# Altium PCB ELF 2 & ELF 2_Lite V1.3.PcbDoc (part 5 of 8)
Units mm, origin at the board's own origin, x right, y up, seen from the top; angles counter-clockwise.
Board outline 120 x 75 mm, 4 copper layers (01 TOP, 02 GND, 03 Signal, 04 BOT), stack 0.603 mm thick; 470 components, 412 nets, 2075 pads, 1565 vias.
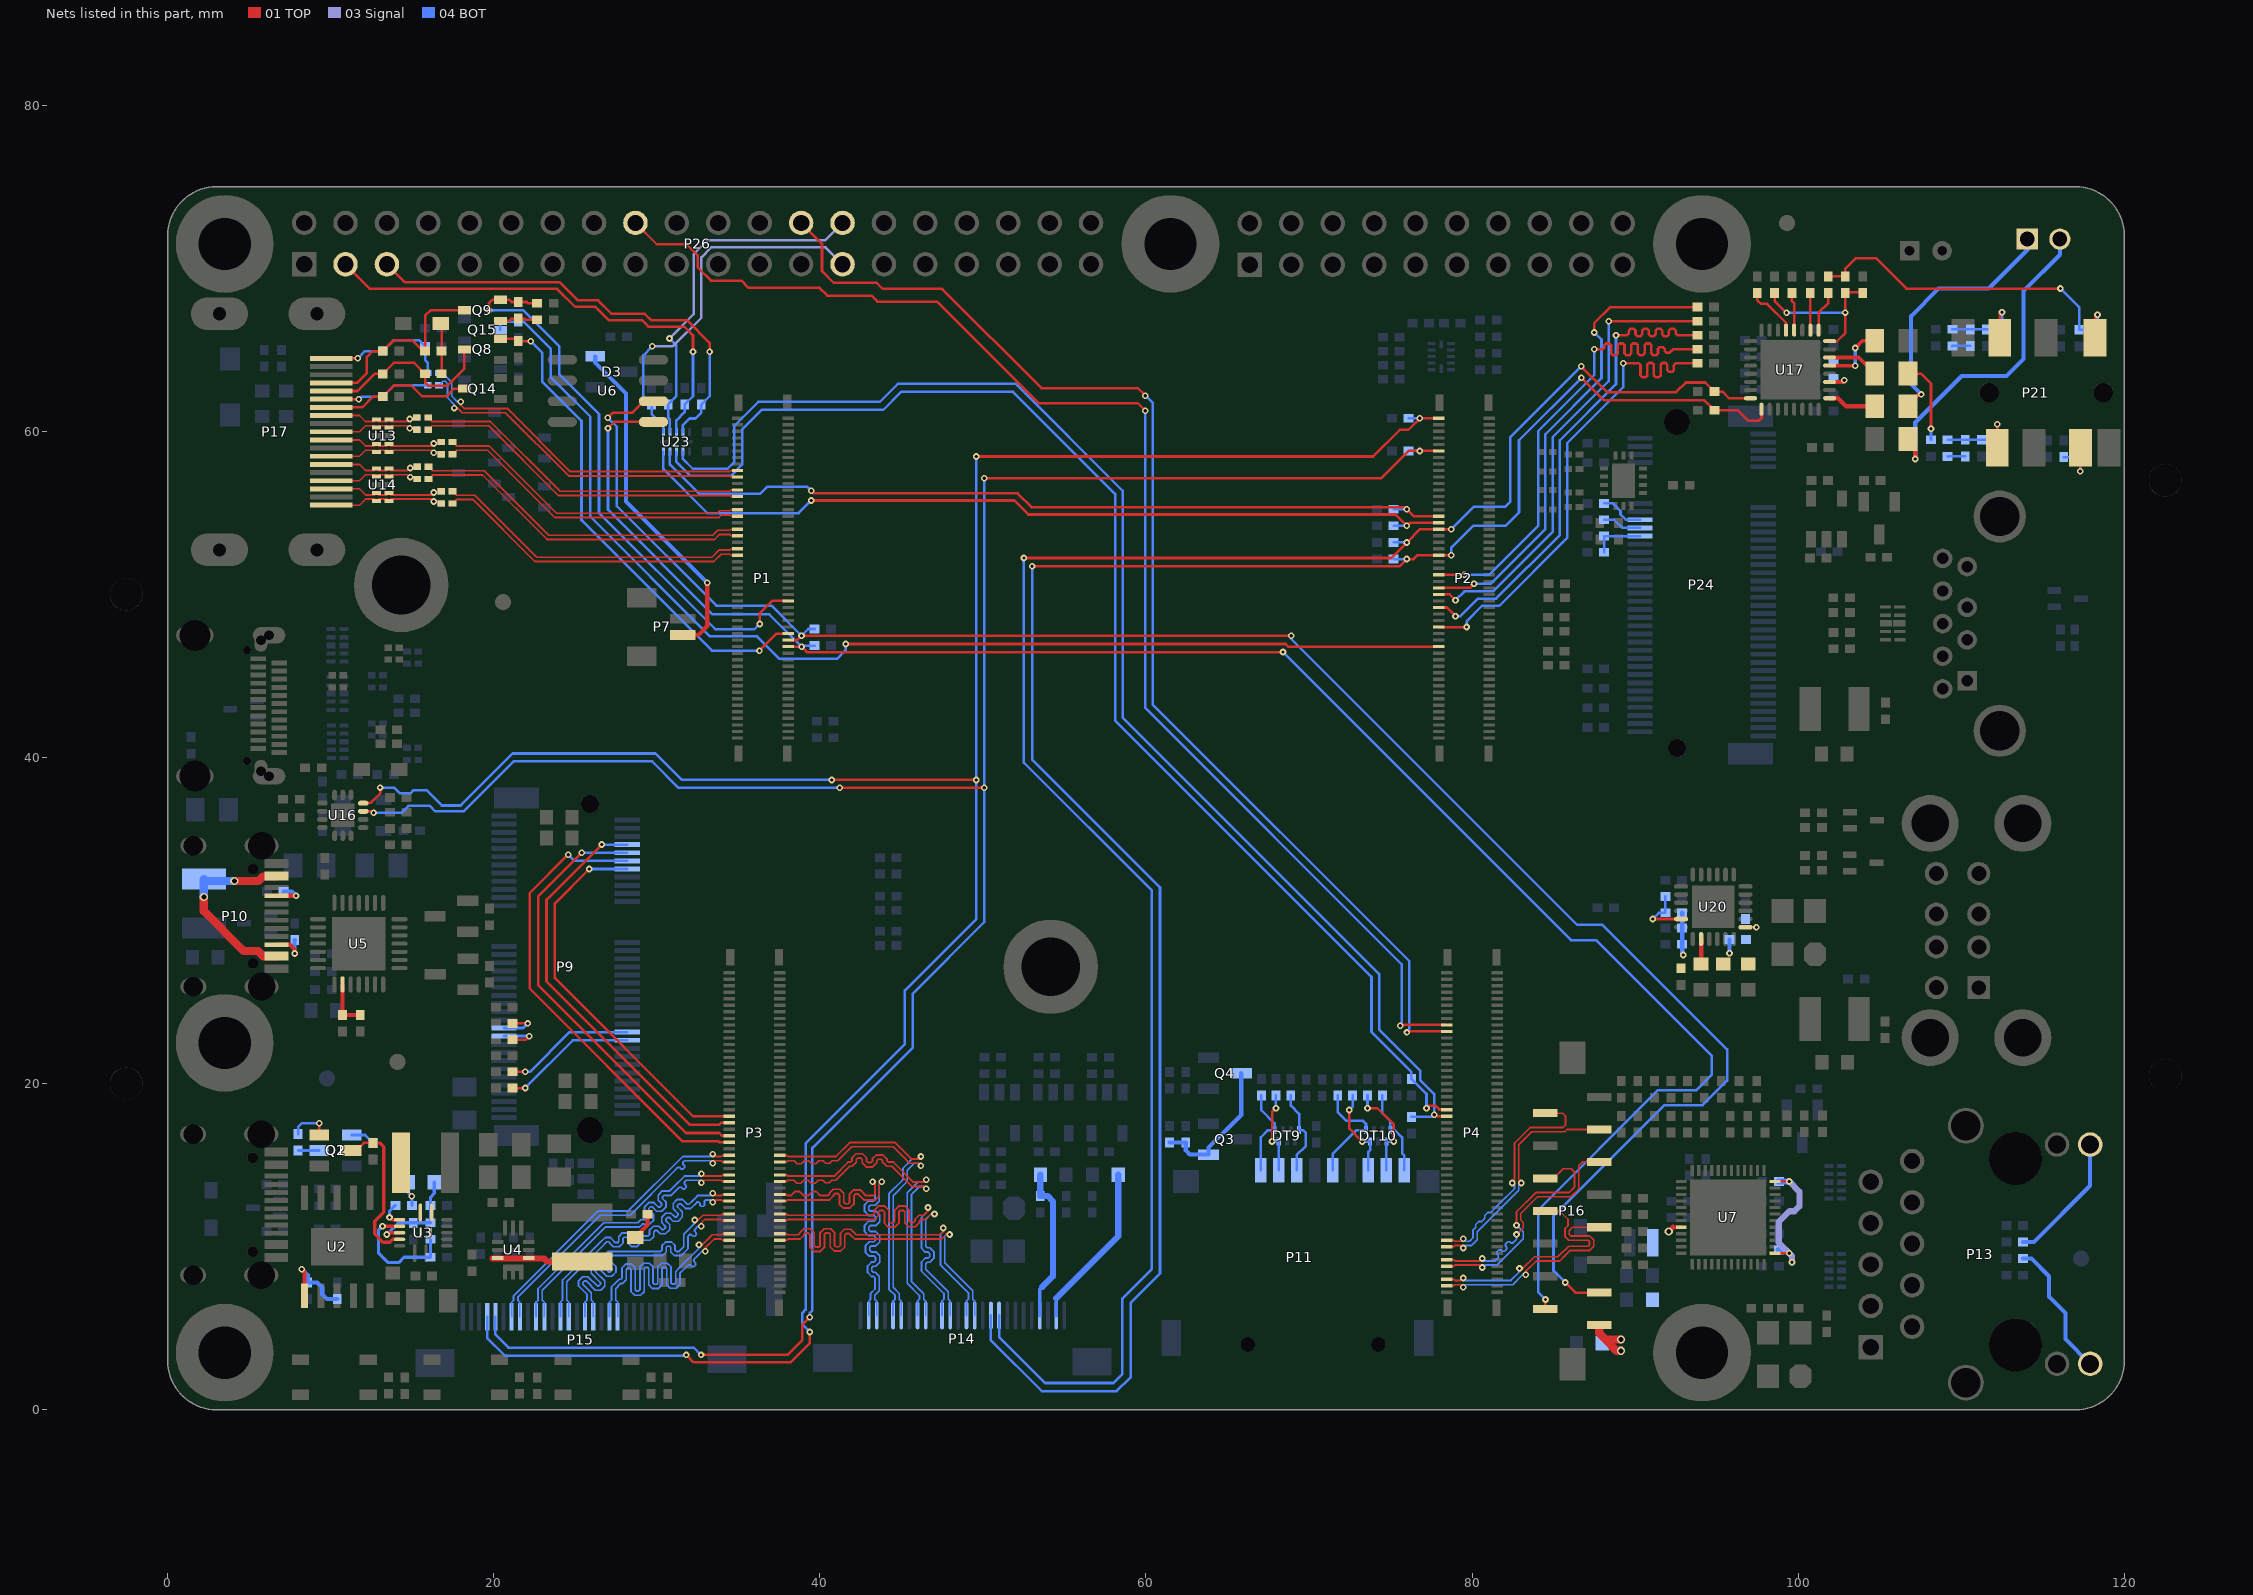
[diagram p6: the nets of this part, all layers, seen from the top]

## Via types
v1: diameter 0.406, hole 0.203, 01 TOP to 04 BOT, tented both sides, 1349 vias
v2: diameter 0.508, hole 0.305, 01 TOP to 04 BOT, tented both sides, 173 vias
v3: diameter 0.6, hole 0.3, 01 TOP to 04 BOT, tented both sides, 34 vias
v4: diameter 0.6, hole 0.3, 01 TOP to 04 BOT, 9 vias

## Nets (pads, with @x,y where several pads share a name; then routed paths per layer and width w, separated by ;. In a path a pad name is that pad's centre, name@x,y a point inside that pad or via, vN(x,y) a via of type N, cw(c..) or ccw(c..) an arc to the next point about the centre after c; other vN are vias at no path point) (continued)
GPIO4_C1--GPIO1_A5--HPDIN: P2.71 Q15.3 R96.2 | length 71.8
  01 TOP w0.156: v1(41.585,46.959) 68.564,46.959 68.724,46.8 P2.71@77.95,46.8
  04 BOT w0.156: Q15.3@20.401,66.226 20.401,66.557 20.578,66.734 R96.2@21.501,66.734 21.812,66.734 23.503,65.043 23.503,63.317 25.917,60.904 25.917,54.775 33.265,47.428 36.147,47.428 37.531,46.044 41.047,46.044 41.585,46.582 v1(41.585,46.959)
GPIO4_C2--GPIO4_B7--HDMI_SCL: P1.68 Q8.2 R81.2 | length 30.6
  01 TOP w0.156: Q8.2@20.401,65.676 21.359,65.676 R81.2@21.501,65.534 v1(22.267,65.534) ; v1(36.293,46.549) 37.344,47.6 P1.68@38.05,47.6
  04 BOT w0.156: v1(22.267,65.534) 22.972,64.828 22.972,63.053 25.381,60.645 25.381,54.553 33.385,46.549 v1(36.293,46.549)
GPIO4_C3--GPIO4_C0--HDMI_SDA: C71.1 P1.58 Q9.2 R83.2 | length 35.7
  01 TOP w0.156: v1(19.708,67.431) 19.708,67.867 19.916,68.076 Q9.2@20.401,68.076 20.95,68.076 21.092,67.934 C71.1@21.501,67.934 22.021,67.934 22.098,67.857 R83.2@22.665,67.857 ; v1(36.307,48.186) 36.307,48.834 37.073,49.6 P1.58@38.05,49.6
  04 BOT w0.156: v1(19.708,67.431) 21.787,67.431 24.021,65.197 24.021,63.499 26.454,61.066 26.454,54.997 33.586,47.864 35.985,47.864 v1(36.307,48.186)
GPIO4_C6--GPIO3_D3: P4.17 P26.18 | length 83.6
  01 TOP w0.156: P26.18@28.69,72.783 29.997,71.476 31.826,71.476 32.5,70.802 32.5,70.065 33.325,69.24 35.181,69.24 35.621,68.8 39.99,68.8 40.464,68.326 43.158,68.326 43.53,67.955 47.172,67.955 53.396,61.73 59.494,61.73 v1(59.958,61.266) ; v1(75.583,23.558) 75.625,23.6 P4.17@78.45,23.6
  04 BOT w0.156: v1(59.958,61.266) 59.958,43.038 75.684,27.312 75.684,23.659 v1(75.583,23.558)
GPIO4_C7--GPIO3_D2: P4.19 P26.26 | length 74.8
  01 TOP w0.156: P26.26@38.85,72.783 40.132,71.501 40.132,69.829 40.847,69.114 43.485,69.114 43.856,68.742 47.498,68.742 53.582,62.658 59.494,62.658 v1(59.958,62.194) ; v1(76.001,23.141) 76.06,23.2 P4.19@78.45,23.2
  04 BOT w0.156: v1(59.958,62.194) 60.422,61.73 60.422,43.23 76.148,27.504 76.148,23.287 v1(76.001,23.141)
HDMI_eARC+: C72.2 DT11.1 P17.14 | length 6.3
  01 TOP w0.156: P17.14@10.038,61.975 v1(11.729,61.975)
  04 BOT w0.156: v1(11.729,61.975) 11.879,62.126 DT11.1@13.193,62.126 13.893,62.826 C72.2@15.958,62.826
HDMI_eARC-: C73.2 DT12.1 P17.19 R98.2 | length 8.1
  01 TOP w0.156: P17.19@10.038,64.475 v1(11.667,64.475)
  04 BOT w0.156: v1(11.667,64.475) 12.118,64.926 DT12.1@13.193,64.926 13.847,65.579 15.44,65.579 R98.2@15.793,65.226 15.793,64.367 15.96,64.2 C73.2@15.96,63.572
HDMI_TX0_N: C65.2 P17.9 R92.1 U13.2 U13.9 | length 7.7
  01 TOP w0.109: P17.9@10.038,59.475 11.769,59.475 12.137,59.107 12.697,59.107 U13.9@12.816,59.226 12.935,59.107 13.467,59.107 U13.2@13.586,59.226 13.705,59.107 16.18,59.107 v1(16.328,59.255) 16.692,59.255 C65.2@16.783,59.346
  04 BOT w0.109: v1(16.328,59.255) 16.692,59.255 R92.1@16.783,59.346
HDMI_TX0_P: C66.2 P17.7 R93.1 U13.1 U13.10 | length 7.7
  01 TOP w0.109: P17.7@10.038,58.475 11.767,58.475 12.137,58.845 12.697,58.845 U13.10@12.816,58.726 12.935,58.845 13.467,58.845 U13.1@13.586,58.726 13.705,58.845 16.18,58.845 v1(16.328,58.696) 16.683,58.696 C66.2@16.783,58.596
  04 BOT w0.109: v1(16.328,58.696) 16.683,58.696 R93.1@16.783,58.596
HDMI_TX1_N: C67.2 P17.6 R90.1 U14.5 U14.6 | length 6.2
  01 TOP w0.109: P17.6@10.038,57.975 11.769,57.975 12.137,57.607 12.697,57.607 U14.6@12.816,57.726 12.935,57.607 13.467,57.607 U14.5@13.586,57.726 13.705,57.607 14.732,57.607 v1(14.881,57.755) 15.236,57.755 C67.2@15.313,57.833
  04 BOT w0.109: v1(14.881,57.755) 15.236,57.755 R90.1@15.313,57.833
HDMI_TX1_P: C68.2 P17.4 R91.1 U14.4 U14.7 | length 6.2
  01 TOP w0.109: P17.4@10.038,56.975 11.767,56.975 12.137,57.345 12.697,57.345 U14.7@12.816,57.226 12.935,57.345 13.467,57.345 U14.4@13.586,57.226 13.705,57.345 14.732,57.345 v1(14.881,57.196) 15.199,57.196 C68.2@15.313,57.083
  04 BOT w0.109: v1(14.881,57.196) 15.199,57.196 R91.1@15.313,57.083
HDMI_TX2_N: C69.2 P17.3 R88.1 U14.2 U14.9 | length 7.7
  01 TOP w0.109: P17.3@10.039,56.475 11.77,56.475 12.138,56.107 12.697,56.107 U14.9@12.816,56.226 12.935,56.107 13.467,56.107 U14.2@13.586,56.226 13.705,56.107 16.18,56.107 v1(16.328,56.255) 16.706,56.255 C69.2@16.783,56.333
  04 BOT w0.109: v1(16.328,56.255) 16.706,56.255 R88.1@16.783,56.333
HDMI_TX2_P: C70.2 P17.1 R89.1 U14.1 U14.10 | length 7.7
  01 TOP w0.109: P17.1@10.038,55.475 11.768,55.475 12.138,55.845 12.506,55.845 12.697,55.845 U14.10@12.816,55.726 12.935,55.845 13.467,55.845 U14.1@13.586,55.726 13.705,55.845 16.18,55.845 v1(16.328,55.696) 16.67,55.696 C70.2@16.783,55.583
  04 BOT w0.109: v1(16.328,55.696) 16.67,55.696 R89.1@16.783,55.583
HDMI_TX3_N: C63.2 P17.12 R86.1 U13.5 U13.6 | length 6.2
  01 TOP w0.109: P17.12@10.039,60.975 11.77,60.975 12.138,60.607 12.697,60.607 U13.6@12.816,60.726 12.935,60.607 13.467,60.607 U13.5@13.586,60.726 13.705,60.607 14.707,60.607 v1(14.855,60.755) 15.197,60.755 C63.2@15.288,60.846
  04 BOT w0.109: v1(14.855,60.755) 15.197,60.755 R86.1@15.288,60.846
HDMI_TX3_P: C64.2 P17.10 R87.1 U13.4 U13.7 | length 6.2
  01 TOP w0.109: P17.10@10.038,59.975 11.768,59.975 12.138,60.345 12.697,60.345 U13.7@12.816,60.226 12.935,60.345 13.467,60.345 U13.4@13.586,60.226 13.705,60.345 14.707,60.345 v1(14.855,60.196) 15.188,60.196 C64.2@15.288,60.096
  04 BOT w0.109: v1(14.855,60.196) 15.188,60.196 R87.1@15.288,60.096
HDMI_TX_CEC_PORT: DT16.1 P17.13 Q14.3 | length 9.2
  01 TOP w0.156: P17.13@10.038,61.475 11.937,61.475 12.588,62.126 DT16.1@13.193,62.126 13.893,62.826 14.942,62.826 15.617,62.15 17.099,62.15 17.575,62.626 Q14.3@18.201,62.626
HDMI_TX_D0_N: C65.1 P1.29 | length 19.4
  01 TOP w0.109: C65.1@17.469,59.346 17.713,59.102 19.724,59.102 23.847,54.979 33.701,54.979 33.853,55.131 34.489,55.131 34.558,55.2 P1.29@34.95,55.2
HDMI_TX_D0_P: C66.1 P1.31 | length 19.4
  01 TOP w0.109: C66.1@17.469,58.596 17.713,58.84 19.616,58.84 23.739,54.717 33.809,54.717 33.961,54.869 34.489,54.869 34.558,54.8 P1.31@34.95,54.8
HDMI_TX_D1_N: C67.1 P1.35 | length 20.8
  01 TOP w0.109: C67.1@15.999,57.833 16.243,57.588 19.419,57.588 23.379,53.628 33.431,53.628 33.733,53.931 34.489,53.931 34.558,54 P1.35@34.95,54
HDMI_TX_D1_P: C68.1 P1.37 | length 20.8
  01 TOP w0.109: C68.1@15.999,57.083 16.243,57.327 19.311,57.327 23.271,53.367 33.539,53.367 33.842,53.669 34.489,53.669 34.558,53.6 P1.37@34.95,53.6
HDMI_TX_D2_N: C69.1 P1.41 | length 19.4
  01 TOP w0.109: C69.1@17.469,56.333 17.713,56.088 18.828,56.088 22.635,52.282 33.383,52.282 33.832,52.731 34.489,52.731 34.558,52.8 P1.41@34.95,52.8
HDMI_TX_D2_P: C70.1 P1.43 | length 19.4
  01 TOP w0.109: C70.1@17.469,55.583 17.713,55.827 18.72,55.827 22.526,52.02 33.492,52.02 33.941,52.469 34.489,52.469 34.558,52.4 P1.43@34.95,52.4
HDMI_TX_D3_N: C63.1 P1.23 | length 20.9
  01 TOP w0.109: C63.1@15.974,60.846 16.218,60.602 19.803,60.602 24.074,56.331 34.489,56.331 34.558,56.4 P1.23@34.95,56.4
HDMI_TX_D3_P: C64.1 P1.25 | length 20.9
  01 TOP w0.109: C64.1@15.974,60.096 16.218,60.34 19.694,60.34 23.965,56.069 34.489,56.069 34.558,56 P1.25@34.95,56
HDMI_TX_SBD_N: C73.1 P1.17 | length 21.5
  01 TOP w0.109: v1(17.983,61.823) 17.983,61.613 18.187,61.409 20.825,61.409 24.703,57.531 34.489,57.531 34.558,57.6 P1.17@34.95,57.6
  04 BOT w0.109: C73.1@16.646,63.572 16.888,63.33 17.122,63.33 17.428,63.024 17.428,62.168 17.773,61.823 v1(17.983,61.823)
HDMI_TX_SBD_P: C72.1 P1.19 | length 21.5
  01 TOP w0.109: v1(17.588,61.428) 17.798,61.428 18.078,61.148 20.716,61.148 24.595,57.269 34.489,57.269 34.558,57.2 P1.19@34.95,57.2
  04 BOT w0.109: C72.1@16.644,62.826 16.887,63.068 17.014,63.068 17.167,62.916 17.167,62.06 17.588,61.638 v1(17.588,61.428)
HDMI_TX_SCL_PORT: DT13.1 P17.15 Q8.3 R82.2 | length 11.4
  01 TOP w0.156: P17.15@10.038,62.475 11.643,62.475 12.694,63.526 DT13.1@13.193,63.526 13.875,64.207 15.112,64.207 R82.2@15.793,63.526 15.793,62.991 15.974,62.81 17.167,62.81 18.201,63.845 Q8.3@18.201,65.026
HDMI_TX_SDA_PORT: DT15.1 P17.16 Q9.3 R85.2 | length 12.4
  01 TOP w0.156: P17.16@10.038,62.975 11.609,62.975 12.222,63.587 12.222,64.571 12.576,64.926 DT15.1@13.193,64.926 13.847,65.579 15.021,65.579 15.675,64.926 R85.2@15.793,64.926 15.793,67.095 16.124,67.426 Q9.3@18.201,67.426
HP_L: DT22.2 P21.5 R128.2 R131.2 R132.1 | length 5.4
  01 TOP w0.156: P21.5@112.202,59.006 v1(112.202,60.433)
  04 BOT w0.156: R128.2@109.156,59.488 R131.2@110.232,59.487 R132.1@111.232,59.487 112.207,59.487 DT22.2@112.232,59.512 112.202,59.542 v1(112.202,60.433)
HP_R: DT23.2 P21.3 R129.2 R133.2 R134.1 | length 5.7
  01 TOP w0.156: P21.3@112.352,65.756 112.352,67.165 v1(112.496,67.309)
  04 BOT w0.156: R129.2@109.448,66.258 R133.2@110.54,66.258 R134.1@111.53,66.258 DT23.2@112.496,66.258 v1(112.496,67.309)
HUB_3V3: C121.2 C123.2 C124.2 FB6.2 R137.1 R140.1 R141.1 R142.1 U20.20 | length 5
  01 TOP w0.279: C123.2@94.038,27.331 U20.20@94.038,28.869
  04 BOT w0.254: R141.1@92.864,30.476 92.884,30.456 R142.1@92.884,29.544 R140.1@92.884,28.544 92.884,27.948 v1(92.942,27.89) ; R137.1@95.78,28.844 95.78,27.999 v1(95.786,27.992)
I2C2--I2C2--SCL: P2.11 P15.26 R1.2 U16.6 | length 147.9
  01 TOP w0.156: U16.6@11.994,36.7 12.539,36.7 v1(12.63,36.608) ; v1(32.715,3.363) 38.013,3.363 38.928,4.277 38.928,5.218 v1(39.385,5.675) ; v1(41.224,38.143) v1(50.082,38.143) ; v1(50.082,57.132) 74.438,57.132 76.106,58.8 v1(76.791,58.8) P2.11@77.95,58.8
  04 BOT w0.156: v1(12.63,36.608) 14.338,36.608 14.762,37.032 16.083,37.032 16.413,36.702 18.151,36.702 21.214,39.765 29.72,39.765 31.343,38.143 v1(41.224,38.143) ; P15.26@20.1,5.7 20.1,4.617 20.905,3.812 32.265,3.812 v1(32.715,3.363) ; v1(39.385,5.675) 39.385,5.942 39.537,6.094 39.537,16.063 45.698,22.225 45.698,25.515 50.082,29.899 v1(50.082,38.143) v1(50.082,57.132) ; R1.2@76.103,58.8 v1(76.791,58.8)
I2C2--I2C2--SDA: P2.1 P15.27 R2.2 U16.7 | length 152
  01 TOP w0.156: U16.7@11.994,37.2 12.021,37.227 12.48,37.227 13.029,37.777 v1(13.029,38.156) ; v1(31.811,3.363) 32.263,2.911 38.2,2.911 39.385,4.095 v1(39.385,4.771) ; v1(40.736,38.623) v1(49.594,38.623) ; v1(49.594,58.46) 73.929,58.46 75.568,60.098 76.09,60.098 v1(76.791,60.8) P2.1@77.95,60.8
  04 BOT w0.156: v1(13.029,38.156) 13.893,38.156 14.253,37.796 14.891,37.796 15.092,37.998 15.882,37.998 16.822,37.058 17.971,37.058 21.16,40.246 29.919,40.246 31.542,38.623 v1(40.736,38.623) ; P15.27@19.6,5.7 19.6,4.41 20.698,3.312 31.76,3.312 v1(31.811,3.363) ; v1(39.385,4.771) 38.928,5.228 38.928,5.947 39.129,6.148 39.129,16.341 45.213,22.425 45.213,25.716 49.594,30.097 v1(49.594,38.623) v1(49.594,58.46) ; R2.2@76.103,60.8 v1(76.791,60.8)
I2C3--I2C3--SCL: C103.2 P2.35 P14.18 R3.2 U17.16 | length 118.2
  01 TOP w0.156: v1(52.513,52.234) 75.043,52.234 v1(75.997,53.187) 76.809,54 P2.35@77.95,54 v1(78.725,54) ; v1(86.684,63.988) 88.27,62.403 92.515,62.403 93.109,62.997 94.296,62.997 C103.2@94.851,62.442 95.343,62.442 95.752,62.032 U17.16@97.072,62.032
  04 BOT w0.156: P14.18@50.991,5.78 50.991,4.463 53.814,1.64 57.993,1.64 58.552,2.199 58.552,6.812 60.359,8.619 60.359,31.832 52.513,39.678 v1(52.513,52.234) ; R3.2@75.189,53.187 v1(75.997,53.187) ; v1(78.725,54) 80.097,55.372 82.017,55.372 82.344,55.699 82.344,59.648 v1(86.684,63.988)
I2C3--I2C3--SDA: C102.2 P2.43 P14.17 R4.2 U17.17 | length 120.3
  01 TOP w0.156: v1(53.013,51.719) 75.544,51.719 v1(75.997,52.171) 76.403,52.171 76.632,52.4 P2.43@77.95,52.4 v1(78.725,52.4) ; v1(86.703,63.284) 88.065,61.922 94.228,61.922 C102.2@94.851,61.299 96.283,61.299 96.926,60.655 97.587,60.655 97.747,60.815 U17.17@97.747,61.357
  04 BOT w0.156: P14.17@50.491,5.78 50.491,4.256 53.607,1.14 58.2,1.14 59.052,1.991 59.052,6.555 60.859,8.362 60.859,32.039 53.013,39.885 v1(53.013,51.719) ; R4.2@75.189,52.171 v1(75.997,52.171) ; v1(78.725,52.4) 78.725,52.867 80.061,54.204 82.042,54.204 82.875,55.036 82.875,59.457 v1(86.703,63.284)
I2C4--I2C4--SCL: P4.45 R10.2 U23.2 | length 82.3
  01 TOP w0.156: v1(77.674,18.085) 77.759,18 P4.45@78.45,18
  04 BOT w0.156: U23.2@31.603,58.76 31.603,58.31 32.206,57.708 34.334,57.708 34.761,58.135 34.761,60.346 36.23,61.815 43.682,61.815 44.775,62.908 52.017,62.908 58.566,56.359 58.566,42.461 74.292,26.735 74.292,23.313 76.81,20.794 76.81,20.227 77.674,19.363 v1(77.674,18.085) 77.547,17.958 R10.2@76.276,17.958
I2C4--I2C4--SCL_3V3: P26.5 R13.1 U23.10 | length 28.1
  01 TOP w0.156: P26.5@13.45,70.243 14.553,69.14 24.053,69.14 25.166,68.027 26.398,68.027 27.213,67.213 29.256,67.213 29.648,66.82 31.847,66.82 33.236,65.432 v1(33.236,64.884)
  04 BOT w0.156: U23.10@31.603,59.96 31.603,60.382 32.01,60.789 32.365,60.789 32.727,61.152 R13.1@32.727,61.646 33.236,62.154 v1(33.236,64.884)
I2C4--I2C4--SDA: P4.43 R9.2 U23.3 | length 80.8
  01 TOP w0.156: v1(77.202,18.497) 77.337,18.631 77.771,18.631 77.99,18.412 P4.43@78.446,18.412
  04 BOT w0.156: U23.3@31.203,58.76 31.203,58.134 32.066,57.272 34.538,57.272 35.252,57.986 35.252,60.142 36.434,61.324 43.885,61.324 44.978,62.417 51.853,62.417 58.102,56.167 58.102,42.269 73.828,26.543 73.828,23.174 76.276,20.725 R9.2@76.276,20.295 77.202,19.369 v1(77.202,18.497)
I2C4--I2C4--SDA_3V3: P26.3 R14.1 U23.9 | length 29.5
  01 TOP w0.156: P26.3@10.91,70.243 12.409,68.744 23.888,68.744 24.998,67.634 26.235,67.634 27.05,66.819 29.093,66.819 29.485,66.427 31.684,66.427 32.22,65.891 v1(32.22,64.884)
  04 BOT w0.156: U23.9@31.203,59.96 31.203,60.667 31.711,61.175 R14.1@31.711,61.646 32.22,62.154 v1(32.22,64.884)
I2C5--I2C7--SCL: P2.31 R11.2 U23.4 | length 50.4
  01 TOP w0.156: v1(39.472,56.363) 39.638,56.196 52.128,56.196 52.975,55.348 75.868,55.348 v1(75.997,55.22) 76.416,54.8 P2.31@77.95,54.8
  04 BOT w0.156: U23.4@30.803,58.76 30.803,57.97 32.588,56.185 36.347,56.185 36.779,56.617 39.218,56.617 v1(39.472,56.363) ; R11.2@75.189,55.22 v1(75.997,55.22)
I2C5--I2C7--SCL_3V3: P26.28 R180.1 U23.8 | length 21.9
  03 Signal w0.156: v1(30.776,65.696) 32.265,67.185 32.265,70.869 33.123,71.727 40.334,71.727 P26.28@41.39,72.783
  04 BOT w0.156: v1(30.776,65.696) 31.206,65.267 31.206,62.156 R180.1@30.695,61.646 30.695,60.846 30.803,60.738 U23.8@30.803,59.96
I2C5--I2C7--SDA: P2.33 R12.2 U23.5 | length 51.6
  01 TOP w0.156: v1(39.464,55.761) 51.932,55.761 52.791,54.902 75.298,54.902 v1(75.997,54.204) 76.193,54.4 P2.33@77.95,54.4
  04 BOT w0.156: U23.5@30.403,58.76 30.403,57.68 33.092,54.991 38.694,54.991 v1(39.464,55.761) ; R12.2@75.189,54.204 v1(75.997,54.204)
I2C5--I2C7--SDA_3V3: P26.27 R181.1 U23.7 | length 22.8
  03 Signal w0.156: v1(29.718,65.211) 30.971,65.211 32.729,66.968 32.729,70.676 33.331,71.278 40.355,71.278 P26.27@41.39,70.243
  04 BOT w0.156: v1(29.718,65.211) 29.171,64.663 29.171,62.154 R181.1@29.679,61.646 29.679,61.075 30.403,60.351 U23.7@30.403,59.96
I2C7--I2C5--SCL: P1.70 P16.3 R5.2 U6.6 | length 115.5
  01 TOP w0.156: v1(27,60.833) 27.315,61.148 28.523,61.148 29.224,61.849 U6.6@29.794,61.849 ; P1.70@38.05,47.2 38.609,47.2 v1(38.874,47.465) v1(68.906,47.465) ; v1(85.72,7.807) 86.338,7.189 P16.3@87.797,7.189
  04 BOT w0.156: v1(27,60.833) 27.545,60.289 27.545,55.424 33.651,49.317 37.021,49.317 v1(38.874,47.465) ; v1(38.874,47.465) 39.288,47.879 R5.2@39.675,47.879 ; v1(68.906,47.465) 68.906,47.273 86.447,29.732 87.993,29.732 95.633,22.092 95.633,20.178 94.132,18.678 91.788,18.678 84.991,11.881 84.991,8.536 v1(85.72,7.807)
I2C7--I2C5--SDA: P1.72 P16.2 R6.2 U6.5 | length 112.6
  01 TOP w0.156: v1(27.008,60.198) 27.389,60.579 U6.5@29.794,60.579 ; P1.72@38.05,46.8 v1(38.877,46.8) 39.209,46.468 v1(68.4,46.468) ; P16.2@84.497,6.189 v1(84.497,6.762)
  04 BOT w0.156: v1(27.008,60.198) 27.008,55.201 33.429,48.781 36.897,48.781 v1(38.877,46.8) 38.94,46.863 R6.2@39.675,46.863 ; v1(68.4,46.468) 86.063,28.805 87.608,28.805 94.705,21.708 94.705,20.563 93.748,19.606 91.403,19.606 84.063,12.265 84.063,7.196 v1(84.497,6.762)
I2S1--I2S0--LRCK: P2.53 R118.1 | length 29
  01 TOP w0.156: P2.53@77.95,50.4 79.864,50.4 v1(80.112,50.648) ; v1(87.488,66.065) 87.488,66.634 88.477,67.624 R118.1@93.822,67.624
  04 BOT w0.156: v1(80.112,50.648) 81.119,50.648 84.49,54.019 84.49,59.824 87.933,63.267 87.933,65.621 v1(87.488,66.065)
I2S1--I2S0--MCLK: P2.65 R116.1 | length 30.8
  01 TOP w0.156: P2.65@77.95,48 v1(79.66,48) ; v1(89.267,64.169) 89.734,64.169 90.222,64.169 90.325,64.067 90.325,63.426 90.428,63.323 90.633,63.323 90.735,63.426 90.735,64.09 90.838,64.193 91.043,64.193 91.146,64.09 91.146,63.426 91.248,63.323 91.454,63.323 91.556,63.426 91.556,64.09 91.659,64.193 91.864,64.193 91.967,64.09 91.967,63.75 92.069,63.648 92.275,63.648 92.377,63.75 92.377,64.067 92.48,64.169 93.702,64.169 R116.1@93.822,64.169
  04 BOT w0.156: v1(79.66,48) 79.66,48.35 80.618,49.307 81.666,49.307 85.824,53.466 85.824,59.271 89.267,62.714 v1(89.267,64.169)
I2S1--I2S0--SCLK: P2.55 R117.1 | length 28.7
  01 TOP w0.156: P2.55@77.95,50 78.628,50 v1(78.982,49.645) ; v1(88.377,66.76) R117.1@93.822,66.76
  04 BOT w0.156: v1(78.982,49.645) 79.522,50.185 81.285,50.185 84.935,53.835 84.935,59.64 88.377,63.083 v1(88.377,66.76)
I2S1--I2S0--SDI0: P2.59 R120.1 | length 30.8
  01 TOP w0.156: P2.59@77.95,49.2 78.448,49.2 v1(78.982,48.666) ; v1(88.822,65.896) 89.427,65.896 89.505,65.896 89.608,65.999 89.608,66.177 89.71,66.28 89.916,66.28 90.018,66.177 90.018,65.943 90.121,65.841 90.326,65.841 90.429,65.943 90.429,66.177 90.531,66.28 90.737,66.28 90.839,66.177 90.839,65.943 90.942,65.841 91.147,65.841 91.25,65.943 91.25,66.177 91.352,66.28 91.557,66.28 91.66,66.177 91.66,65.943 91.763,65.841 91.968,65.841 92.071,65.943 92.071,66.177 92.173,66.28 92.378,66.28 92.481,66.177 92.481,65.999 92.584,65.896 93.34,65.896 R120.1@93.822,65.896
  04 BOT w0.156: v1(78.982,48.666) 79.284,48.666 80.361,49.743 81.472,49.743 85.38,53.65 85.38,59.456 88.822,62.898 v1(88.822,65.896)
I2S1--I2S0--SDO0: P2.49 R119.1 | length 31
  01 TOP w0.156: P2.49@77.95,51.2 v1(79.51,51.2) ; v1(87.488,65.033) 87.933,65.033 88.011,65.033 88.113,65.135 88.113,65.286 88.216,65.388 88.421,65.388 88.524,65.286 88.524,64.78 88.627,64.677 88.832,64.677 88.934,64.78 88.934,65.286 89.037,65.388 89.242,65.388 89.345,65.286 89.345,64.78 89.447,64.677 89.653,64.677 89.755,64.78 89.755,65.286 89.858,65.388 90.063,65.388 90.166,65.286 90.166,64.78 90.268,64.677 90.474,64.677 90.576,64.78 90.576,65.286 90.679,65.388 90.884,65.388 90.987,65.286 90.987,64.78 91.089,64.677 91.295,64.677 91.397,64.78 91.397,65.065 91.5,65.168 91.705,65.168 91.808,65.065 91.808,64.93 91.91,64.828 92.115,64.828 92.218,64.93 92.321,65.033 93.34,65.033 R119.1@93.822,65.033
  04 BOT w0.156: v1(79.51,51.2) 81.042,51.2 84.045,54.203 84.045,60.008 87.488,63.451 v1(87.488,65.033)
I2S2_LRCK_M0: P3.51 P9.10 | length 27.6
  01 TOP w0.156: v1(25.406,34.161) 22.721,31.476 22.721,26.049 31.796,16.973 33.828,16.973 34.001,16.8 P3.51@34.45,16.8
  04 BOT w0.156: v1(25.406,34.161) P9.10@28.179,34.161
I2S2_SCLK_M0: P3.47 P9.8 | length 26.3
  01 TOP w0.156: v1(26.632,34.661) 23.234,31.263 23.234,26.262 32.009,17.487 33.833,17.487 33.947,17.6 P3.47@34.45,17.6
  04 BOT w0.156: v1(26.632,34.661) P9.8@28.179,34.661
I2S2_SDI_M0: P3.53 P9.12 | length 29.1
  01 TOP w0.156: v1(24.56,34.041) 22.207,31.688 22.207,25.836 31.584,16.46 33.776,16.46 33.836,16.4 P3.53@34.45,16.4
  04 BOT w0.156: v1(24.56,34.041) 24.94,33.661 P9.12@28.179,33.661
I2S2_SDO_M0: P3.45 P9.14 | length 24.1
  01 TOP w0.156: v1(25.858,33.161) 23.747,31.051 23.747,26.474 32.221,18 P3.45@34.45,18
  04 BOT w0.156: v1(25.858,33.161) P9.14@28.179,33.161
LHP: C104.2 R128.1 | length 5.1
  01 TOP w0.156: C104.2@106.726,63.547 107.52,63.547 108.14,62.927 v1(108.14,60.161)
  04 BOT w0.156: R128.1@108.14,59.488 v1(108.14,60.161)
LMIC_P: C106.1 DT25.2 P21.1 R123.1 R124.2 | length 22.3
  01 TOP w0.156: C106.1@101.844,69.501 R123.1@102.889,69.501 102.889,69.983 103.531,70.624 104.763,70.624 106.629,68.758 v1(116.078,68.758) ; P21.1@118.202,65.756 118.202,67.001 v1(118.35,67.15)
  04 BOT w0.156: v1(116.078,68.758) 117.22,67.616 R124.2@117.22,66.233 DT25.2@118.35,66.233 v1(118.35,67.15)
LSPKOUT: C122.1 U17.25 | length 3
  01 TOP w0.254: U17.25@101.922,62.032 102.438,62.032 102.93,61.54 C122.1@104.694,61.54
MICBIAS: C114.2 R122.2 R123.2 U17.32 | length 9.9
  01 TOP w0.156: R122.2@98.546,68.488 98.546,68.005 v1(99.283,67.268) ; U17.32@101.922,65.532 102.392,65.532 102.889,66.03 102.889,68.539 C114.2@103.956,68.539
  04 BOT w0.156: v1(99.283,67.268) v1@102.889,67.268
  other v1: 102.889,67.284
MIPI_DPHY_CSI0_RX_CLK_N: P3.72 P14.3 | length 20.5
  01 TOP w0.109: P3.72@37.55,12.8 37.968,12.8 38.037,12.869 40.352,12.869 40.591,12.869 40.835,13.113 40.835,13.166 40.926,13.257 41.108,13.257 41.199,13.166 41.199,12.615 41.443,12.371 41.841,12.371 42.085,12.615 42.085,13.133 42.176,13.223 42.358,13.223 42.448,13.133 42.448,13.113 42.692,12.869 42.942,12.869 43.409,12.869 43.643,13.103 43.643,13.83 v1(43.791,13.979)
  04 BOT w0.109: P14.3@43.491,5.78 43.491,6.663 43.372,6.782 43.372,7.029 43.643,7.299 43.643,7.552 43.643,8.189 43.399,8.433 43.277,8.433 43.186,8.524 43.186,8.705 43.277,8.796 43.426,8.796 43.67,9.04 43.67,9.438 43.426,9.682 43.145,9.682 43.054,9.773 43.054,9.955 43.145,10.046 43.426,10.046 43.67,10.29 43.67,10.688 43.426,10.932 43.093,10.932 43.002,11.023 43.002,11.205 43.093,11.295 43.426,11.295 43.67,11.539 43.67,11.938 43.426,12.182 43.093,12.182 43.002,12.273 43.002,12.454 43.093,12.545 43.399,12.545 43.643,12.789 43.643,13.654 43.643,13.83 v1(43.791,13.979)
MIPI_DPHY_CSI0_RX_CLK_P: P3.70 P14.2 | length 20.5
  01 TOP w0.109: P3.70@37.55,13.2 37.968,13.2 38.037,13.131 38.171,13.131 38.226,13.131 38.486,13.391 38.74,13.391 39.001,13.131 39.276,13.131 39.528,13.383 39.782,13.383 40.034,13.131 40.352,13.131 40.483,13.131 40.574,13.222 40.574,13.275 40.818,13.519 41.216,13.519 41.46,13.275 41.46,12.724 41.551,12.633 41.733,12.633 41.823,12.724 41.823,13.241 42.068,13.485 42.466,13.485 42.71,13.241 42.71,13.222 42.801,13.131 42.942,13.131 43.301,13.131 43.381,13.211 43.381,13.83 v1(43.233,13.979)
  04 BOT w0.109: P14.2@42.991,5.78 42.991,6.663 43.111,6.782 43.111,7.137 43.381,7.408 43.381,7.552 43.381,8.08 43.29,8.171 43.169,8.171 42.925,8.415 42.925,8.814 43.169,9.058 43.318,9.058 43.409,9.148 43.409,9.33 43.318,9.421 43.037,9.421 42.793,9.665 42.793,10.063 43.037,10.307 43.318,10.307 43.409,10.398 43.409,10.58 43.318,10.671 42.985,10.671 42.741,10.915 42.741,11.313 42.985,11.557 43.318,11.557 43.409,11.648 43.409,11.829 43.318,11.92 42.985,11.92 42.741,12.164 42.741,12.563 42.985,12.807 43.29,12.807 43.381,12.897 43.381,13.654 43.381,13.83 v1(43.233,13.979)
MIPI_DPHY_CSI0_RX_D0_N: P3.60 P14.6 | length 20.5
  01 TOP w0.109: P3.60@37.55,15.2 37.968,15.2 38.037,15.269 38.374,15.269 38.429,15.269 38.607,15.091 38.861,15.091 39.038,15.269 39.314,15.269 39.492,15.091 39.746,15.091 39.924,15.269 40.2,15.269 40.345,15.123 40.599,15.123 40.745,15.269 40.94,15.269 41.019,15.269 41.092,15.269 41.947,16.124 44.505,16.124 45.507,15.122 46.049,15.122 v1(46.197,14.973)
  04 BOT w0.109: P14.6@44.991,5.78 44.991,6.663 44.872,6.782 44.872,7.132 44.496,7.508 44.496,13.135 45.359,13.999 45.359,14.7 45.781,15.122 46.049,15.122 v1(46.197,14.973)
MIPI_DPHY_CSI0_RX_D0_P: P3.58 P14.5 | length 20.5
  01 TOP w0.109: P3.58@37.55,15.6 37.968,15.6 38.037,15.531 40.983,15.531 41.839,16.386 44.613,16.386 45.616,15.383 46.049,15.383 v1(46.197,15.532)
  04 BOT w0.109: P14.5@44.491,5.78 44.491,6.663 44.611,6.782 44.611,7.024 44.234,7.4 44.234,13.244 45.098,14.107 45.098,14.808 45.673,15.383 46.049,15.383 v1(46.197,15.532)
MIPI_DPHY_CSI0_RX_D1_N: P3.66 P14.9 | length 20.5
  01 TOP w0.109: P3.66@37.55,14 37.968,14 38.037,14.069 38.349,14.069 38.403,14.069 38.581,13.891 38.835,13.891 39.013,14.069 39.289,14.069 39.467,13.891 39.721,13.891 39.898,14.069 40.174,14.069 40.32,13.923 40.574,13.923 40.72,14.069 40.94,14.069 40.961,14.069 40.98,14.069 41.751,14.84 41.841,14.93 41.991,14.93 42.235,15.174 42.235,15.345 42.326,15.436 42.507,15.436 42.598,15.345 42.598,15.138 42.842,14.894 43.241,14.894 43.485,15.138 43.485,15.273 43.575,15.364 43.757,15.364 43.848,15.273 43.848,15.174 44.092,14.93 44.362,14.93 44.4,14.93 45.631,13.699 46.379,13.699 v1(46.528,13.551)
  04 BOT w0.109: P14.9@46.491,5.78 46.491,6.663 46.372,6.782 46.372,7.111 45.625,7.858 45.625,13.204 46.121,13.699 46.379,13.699 v1(46.528,13.551)
MIPI_DPHY_CSI0_RX_D1_P: P3.64 P14.8 | length 20.5
  01 TOP w0.109: P3.64@37.55,14.4 37.968,14.4 38.037,14.331 40.872,14.331 41.733,15.192 41.751,15.192 41.883,15.192 41.973,15.282 41.973,15.453 42.217,15.697 42.616,15.697 42.86,15.453 42.86,15.246 42.951,15.156 43.132,15.156 43.223,15.246 43.223,15.382 43.467,15.626 43.865,15.626 44.11,15.382 44.11,15.282 44.2,15.192 44.362,15.192 44.508,15.192 45.739,13.961 46.379,13.961 v1(46.528,14.11)
  04 BOT w0.109: P14.8@45.991,5.78 45.991,6.663 46.111,6.782 46.111,7.003 45.364,7.75 45.364,13.312 46.013,13.961 46.379,13.961 v1(46.528,14.11)
MIPI_DPHY_CSI0_RX_D2_N: P3.78 P14.12 | length 20.5
  01 TOP w0.109: P3.78@37.55,11.6 37.968,11.6 38.037,11.669 43.114,11.669 43.353,11.669 43.598,11.913 43.598,12.135 43.688,12.225 43.87,12.225 43.961,12.135 43.961,11.447 44.205,11.203 44.603,11.203 44.847,11.447 44.847,12.135 44.938,12.225 45.12,12.225 45.21,12.135 45.21,11.472 45.455,11.228 45.853,11.228 46.097,11.472 46.097,11.578 46.188,11.669 46.331,11.669 46.479,11.669 46.816,12.007 v1(47.026,12.007)
  04 BOT w0.109: v1(47.026,12.007) 46.816,12.007 46.492,11.683 46.492,11.404 46.492,10.023 46.583,9.932 46.75,9.932 46.994,9.688 46.994,9.29 46.75,9.046 46.583,9.046 46.492,8.955 46.492,8.731 46.492,8.612 47.872,7.232 47.872,6.782 47.991,6.663 P14.12@47.991,5.78
MIPI_DPHY_CSI0_RX_D2_P: P3.76 P14.11 | length 20.5
  01 TOP w0.109: P3.76@37.55,12 37.968,12 38.037,11.931 43.114,11.931 43.245,11.931 43.336,12.022 43.336,12.243 43.58,12.487 43.978,12.487 44.222,12.243 44.222,11.556 44.313,11.465 44.495,11.465 44.586,11.556 44.586,12.243 44.83,12.487 45.228,12.487 45.472,12.243 45.472,11.58 45.563,11.49 45.744,11.49 45.835,11.58 45.835,11.687 46.079,11.931 46.331,11.931 46.37,11.931 46.631,12.192 v1(46.631,12.402)
  04 BOT w0.109: v1(46.631,12.402) 46.631,12.192 46.23,11.791 46.23,11.404 46.23,9.914 46.474,9.67 46.641,9.67 46.732,9.58 46.732,9.398 46.641,9.307 46.474,9.307 46.23,9.063 46.23,8.731 46.23,8.504 47.611,7.124 47.611,6.782 47.491,6.663 P14.11@47.491,5.78
MIPI_DPHY_CSI0_RX_D3_N: P3.84 P14.15 | length 20.5
  01 TOP w0.109: P3.84@37.55,10.4 37.968,10.4 38.037,10.469 38.542,10.469 38.782,10.469 39.026,10.713 39.026,10.754 39.117,10.845 39.298,10.845 39.389,10.754 39.389,9.956 39.633,9.712 40.032,9.712 40.276,9.956 40.276,10.754 40.366,10.845 40.548,10.845 40.639,10.754 40.639,9.979 40.883,9.735 41.281,9.735 41.525,9.979 41.525,10.713 41.616,10.804 41.798,10.804 41.889,10.713 42.133,10.469 42.54,10.469 47.463,10.469 47.743,10.75 v1(47.953,10.75)
  04 BOT w0.109: v1(47.953,10.75) 47.743,10.75 47.653,10.659 47.653,9.009 49.372,7.289 49.372,6.782 49.491,6.663 P14.15@49.491,5.78
MIPI_DPHY_CSI0_RX_D3_P: P3.82 P14.14 | length 20.5
  01 TOP w0.109: P3.82@37.55,10.8 37.968,10.8 38.037,10.731 38.542,10.731 38.674,10.731 38.764,10.822 38.764,10.863 39.008,11.107 39.407,11.107 39.651,10.863 39.651,10.064 39.742,9.973 39.923,9.973 40.014,10.064 40.014,10.863 40.258,11.107 40.656,11.107 40.9,10.863 40.9,10.087 40.991,9.996 41.173,9.996 41.264,10.087 41.264,10.822 41.508,11.066 41.906,11.066 42.15,10.822 42.241,10.731 42.54,10.731 47.355,10.731 47.558,10.935 v1(47.558,11.145)
  04 BOT w0.109: v1(47.558,11.145) 47.558,10.935 47.391,10.767 47.391,8.9 49.111,7.181 49.111,6.782 48.991,6.663 P14.14@48.991,5.78
MIPI_DPHY_CSI2_RX_CLK_N: P4.95 P16.8 | length 14.5
  01 TOP w0.109: P4.95@78.45,8 78.877,8 78.946,7.931 79.297,7.931 v1(79.446,8.079) ; v1(82.902,8.668) 83.113,8.668 83.826,9.381 85.263,9.381 85.288,9.407 85.914,10.033 87.11,10.033 87.201,10.124 87.201,10.306 87.11,10.396 85.935,10.396 85.691,10.64 85.691,10.88 85.691,11.093 85.881,11.284 85.881,11.666 85.358,12.189 P16.8@84.497,12.189
  04 BOT w0.109: v1(79.446,8.079) 79.595,7.931 82.375,7.931 82.902,8.458 v1(82.902,8.668)
MIPI_DPHY_CSI2_RX_CLK_P: P4.97 P16.7 | length 14.5
  01 TOP w0.109: P4.97@78.45,7.6 78.877,7.6 78.946,7.669 79.297,7.669 v1(79.446,7.521) ; v1(83.298,8.273) 83.298,8.483 83.934,9.12 85.371,9.12 85.658,9.407 86.023,9.771 87.219,9.771 87.463,10.016 87.463,10.414 87.219,10.658 86.044,10.658 85.953,10.749 85.953,10.88 85.953,10.985 86.157,11.189 P16.7@87.797,11.189
  04 BOT w0.109: v1(79.446,7.521) 79.595,7.669 79.979,7.669 82.484,7.669 83.087,8.273 v1(83.298,8.273)
MIPI_DPHY_CSI2_RX_D0_N: P4.83 P16.14 | length 14.5
  01 TOP w0.109: P4.83@78.45,10.4 78.877,10.4 78.946,10.331 79.297,10.331 v1(79.446,10.479) ; v1(82.455,13.906) 82.604,14.055 82.604,16.357 83.556,17.309 85.566,17.309 85.726,17.469 85.726,18.011 85.548,18.189 P16.14@84.497,18.189
  04 BOT w0.109: v1(79.446,10.479) 79.595,10.331 79.843,10.331 80.056,10.543 80.056,11.019 80.164,11.127 80.221,11.184 80.221,11.363 80.4,11.543 80.58,11.543 80.775,11.738 80.775,11.915 80.954,12.095 81.132,12.095 81.726,12.689 82.604,13.567 82.604,13.758 v1(82.455,13.906)
MIPI_DPHY_CSI2_RX_D0_P: P4.85 P16.13 | length 14.5
  01 TOP w0.109: P4.85@78.45,10 78.877,10 78.946,10.069 79.297,10.069 v1(79.446,9.921) ; v1(83.014,13.906) 82.865,14.055 82.865,16.249 83.664,17.047 85.674,17.047 85.816,17.189 P16.13@87.797,17.189
  04 BOT w0.109: v1(79.446,9.921) 79.595,10.069 79.952,10.069 80.317,10.435 80.317,10.91 82.865,13.459 82.865,13.758 v1(83.014,13.906)
MIPI_DPHY_CSI2_RX_D1_N: P4.89 P16.11 | length 14.5
  01 TOP w0.109: P4.89@78.45,9.2 78.877,9.2 78.946,9.131 80.466,9.131 v1(80.614,9.279) ; v1(82.722,10.753) 82.87,10.902 82.893,10.902 83.138,11.147 83.138,11.483 82.984,11.637 82.984,12.034 84.007,13.057 86.049,13.057 86.533,13.54 86.533,14.967 86.754,15.189 P16.11@87.797,15.189
  04 BOT w0.109: v1(80.614,9.279) 80.763,9.131 81.397,9.131 81.563,9.297 81.601,9.335 81.601,9.464 81.518,9.547 81.518,9.676 81.646,9.804 81.775,9.804 81.858,9.721 81.987,9.721 82.115,9.849 82.115,9.977 82.051,10.041 82.051,10.169 82.18,10.298 82.308,10.298 82.372,10.234 82.5,10.234 82.668,10.402 82.722,10.456 v1(82.722,10.753)
MIPI_DPHY_CSI2_RX_D1_P: P4.91 P16.10 | length 14.5
  01 TOP w0.109: P4.91@78.45,8.8 78.877,8.8 78.946,8.869 80.466,8.869 v1(80.614,8.721) ; v1(82.722,11.312) 82.722,12.142 83.898,13.318 85.941,13.318 86.271,13.649 86.271,14.59 86.081,14.78 85.581,14.78 84.99,14.189 P16.10@84.497,14.189
  04 BOT w0.109: v1(80.614,8.721) 80.763,8.869 81.505,8.869 83.132,10.496 83.132,10.924 82.893,11.163 82.87,11.163 v1(82.722,11.312)
MIPI_DPHY_DSI_TX_CLK_N: P3.69 P15.18 | length 18.3
  01 TOP w0.109: v1(33.421,13.279) 33.57,13.131 33.958,13.131 34.027,13.2 P3.69@34.45,13.2
  04 BOT w0.109: P15.18@24.1,5.7 24.1,6.608 24.219,6.727 24.219,7.949 26.512,10.242 26.834,10.564 27.152,10.564 27.377,10.339 27.377,10.324 27.449,10.252 27.593,10.252 27.664,10.324 27.664,10.621 27.889,10.846 28.25,10.846 28.475,10.621 28.475,10.35 28.546,10.278 28.69,10.278 28.762,10.35 28.762,10.43 28.987,10.655 29.332,10.655 29.472,10.655 29.544,10.727 29.544,11.003 29.799,11.258 30.117,11.258 30.323,11.052 30.424,11.052 30.526,11.154 30.526,11.255 30.298,11.483 30.298,11.801 30.553,12.056 30.871,12.056 31.099,11.828 31.2,11.828 31.302,11.929 31.302,12.031 31.005,12.328 31.005,12.646 31.259,12.901 31.578,12.901 31.873,12.606 31.974,12.606 32.162,12.794 32.499,13.131 33.273,13.131 v1(33.421,13.279)
MIPI_DPHY_DSI_TX_CLK_P: P3.71 P15.17 | length 18.2
  01 TOP w0.109: v1(33.421,12.721) 33.57,12.869 33.958,12.869 34.027,12.8 P3.71@34.45,12.8
  04 BOT w0.109: P15.17@24.6,5.7 24.6,6.608 24.481,6.727 24.481,7.841 26.576,9.936 26.942,10.302 27.044,10.302 27.116,10.23 27.116,10.215 27.341,9.99 27.701,9.99 27.926,10.215 27.926,10.512 27.998,10.584 28.141,10.584 28.213,10.512 28.213,10.241 28.438,10.016 28.798,10.016 29.023,10.241 29.023,10.322 29.095,10.394 29.332,10.394 29.581,10.394 29.806,10.619 29.806,10.895 29.907,10.996 30.009,10.996 30.215,10.79 30.533,10.79 30.788,11.045 30.788,11.363 30.56,11.591 30.56,11.693 30.661,11.794 30.763,11.794 30.991,11.566 31.309,11.566 31.563,11.821 31.563,12.139 31.266,12.437 31.266,12.538 31.368,12.64 31.469,12.64 31.764,12.344 32.083,12.344 32.472,12.734 32.573,12.734 32.645,12.662 32.645,12.551 32.717,12.479 32.861,12.479 32.932,12.551 32.932,12.797 33.004,12.869 33.273,12.869 v1(33.421,12.721)
MIPI_DPHY_DSI_TX_D0_N: P3.57 P15.24 | length 18.3
  01 TOP w0.109: v1(33.421,15.679) 33.57,15.531 33.958,15.531 34.027,15.6 P3.57@34.45,15.6
  04 BOT w0.109: P15.24@21.1,5.7 21.1,6.608 21.219,6.727 21.219,6.998 26.414,12.193 28.252,12.193 31.591,15.531 33.273,15.531 v1(33.421,15.679)
MIPI_DPHY_DSI_TX_D0_P: P3.59 P15.23 | length 18.3
  01 TOP w0.109: v1(33.421,15.121) 33.57,15.269 33.958,15.269 34.027,15.2 P3.59@34.45,15.2
  04 BOT w0.109: P15.23@21.6,5.7 21.6,6.608 21.481,6.727 21.481,6.89 26.522,11.931 28.361,11.931 31.052,14.622 31.293,14.864 31.395,14.864 31.502,14.757 31.603,14.757 31.705,14.858 31.705,14.96 31.598,15.067 31.598,15.168 31.699,15.269 33.273,15.269 v1(33.421,15.121)
MIPI_DPHY_DSI_TX_D1_N: P3.63 P15.21 | length 18.3
  01 TOP w0.109: v1(32.735,14.479) 32.884,14.331 33.958,14.331 34.027,14.4 P3.63@34.45,14.4
  04 BOT w0.109: P15.21@22.6,5.7 22.6,6.608 22.719,6.727 22.719,7.438 26.754,11.473 28.007,11.473 28.839,11.473 29.012,11.646 29.33,11.646 29.338,11.638 29.439,11.638 29.541,11.74 29.541,11.841 29.25,12.132 29.25,12.45 29.505,12.705 29.823,12.705 30.092,12.436 30.193,12.436 30.295,12.538 30.295,12.639 30.088,12.846 30.088,13.165 30.342,13.419 30.661,13.419 30.672,13.408 30.774,13.408 31.142,13.776 31.697,14.331 32.587,14.331 v1(32.735,14.479)
MIPI_DPHY_DSI_TX_D1_P: P3.65 P15.20 | length 18.2
  01 TOP w0.109: v1(32.735,13.921) 32.884,14.069 33.958,14.069 34.027,14 P3.65@34.45,14
  04 BOT w0.109: P15.20@23.1,5.7 23.1,6.608 22.981,6.727 22.981,7.33 26.863,11.211 28.035,11.211 28.947,11.211 29.12,11.384 29.222,11.384 29.23,11.377 29.548,11.377 29.803,11.631 29.803,11.95 29.512,12.24 29.512,12.342 29.613,12.443 29.715,12.443 29.984,12.175 30.302,12.175 30.556,12.429 30.556,12.748 30.349,12.955 30.349,13.056 30.451,13.158 30.552,13.158 30.564,13.146 30.882,13.146 31.327,13.591 31.387,13.651 31.489,13.651 31.595,13.544 31.697,13.544 31.798,13.646 31.798,13.747 31.692,13.854 31.692,13.956 31.805,14.069 32.587,14.069 v1(32.735,13.921)
MIPI_DPHY_DSI_TX_D2_N: P3.75 P15.15 | length 18.3
  01 TOP w0.109: v1(32.331,11.64) 32.541,11.64 32.832,11.931 33.958,11.931 34.027,12 P3.75@34.45,12
  04 BOT w0.109: P15.15@25.6,5.7 25.6,6.608 25.719,6.727 25.719,7.071 25.202,7.589 25.202,7.907 25.457,8.161 25.775,8.161 26.343,7.593 26.444,7.593 26.546,7.695 26.546,7.796 25.978,8.364 25.978,8.683 26.232,8.937 26.551,8.937 27.035,8.453 27.136,8.453 27.238,8.555 27.238,8.656 26.754,9.14 26.754,9.459 27.008,9.713 30.11,9.713 30.241,9.713 30.313,9.785 30.313,10.061 30.538,10.286 30.898,10.286 31.123,10.061 31.123,9.785 31.195,9.713 31.364,9.713 31.378,9.713 31.654,9.989 31.654,10.752 32.331,11.43 v1(32.331,11.64)
MIPI_DPHY_DSI_TX_D2_P: P3.77 P15.14 | length 18.2
  01 TOP w0.109: v1(32.726,11.245) 32.726,11.455 32.94,11.669 33.958,11.669 34.027,11.6 P3.77@34.45,11.6
  04 BOT w0.109: P15.14@26.1,5.7 26.1,6.608 25.981,6.727 25.981,7.179 25.463,7.697 25.463,7.798 25.565,7.9 25.666,7.9 26.235,7.332 26.553,7.332 26.807,7.586 26.807,7.905 26.239,8.473 26.239,8.574 26.341,8.676 26.442,8.676 26.926,8.192 27.245,8.192 27.499,8.446 27.499,8.764 27.015,9.249 27.015,9.35 27.117,9.452 30.11,9.452 30.35,9.452 30.575,9.677 30.575,9.953 30.647,10.025 30.79,10.025 30.862,9.953 30.862,9.677 31.087,9.452 31.364,9.452 31.487,9.452 31.915,9.88 31.915,10.644 32.012,10.741 32.113,10.741 32.22,10.634 32.321,10.634 32.423,10.735 32.423,10.837 32.316,10.944 32.316,11.045 32.516,11.245 v1(32.726,11.245)
MIPI_DPHY_DSI_TX_D3_N: P3.81 P15.12 | length 18.3
  01 TOP w0.109: v1(32.585,10.116) 32.795,10.116 33.41,10.731 33.958,10.731 34.027,10.8 P3.81@34.45,10.8
  04 BOT w0.109: P15.12@27.1,5.7 27.1,6.608 27.219,6.727 27.219,7.538 27.41,7.728 27.69,8.009 27.794,8.009 27.866,8.08 27.866,8.71 28.091,8.935 28.451,8.935 28.676,8.71 28.676,7.357 28.748,7.285 28.891,7.285 28.963,7.357 28.963,8.766 29.188,8.991 29.548,8.991 29.773,8.766 29.773,7.763 29.845,7.691 29.989,7.691 30.06,7.763 30.06,8.766 30.285,8.991 30.646,8.991 30.871,8.766 30.871,7.778 30.942,7.707 31.086,7.707 31.158,7.778 31.158,8.479 31.445,8.766 31.474,8.795 32.585,9.906 v1(32.585,10.116)
MIPI_DPHY_DSI_TX_D3_P: P3.83 P15.11 | length 18.2
  01 TOP w0.109: v1(32.98,9.721) 32.98,9.931 33.518,10.469 33.958,10.469 34.027,10.4 P3.83@34.45,10.4
  04 BOT w0.109: P15.11@27.6,5.7 27.6,6.608 27.481,6.727 27.481,6.773 27.481,7.429 27.799,7.747 27.903,7.747 28.128,7.972 28.128,8.602 28.199,8.674 28.343,8.674 28.415,8.602 28.415,7.248 28.64,7.023 29,7.023 29.225,7.248 29.225,8.658 29.297,8.729 29.44,8.729 29.512,8.658 29.512,7.654 29.737,7.429 30.097,7.429 30.322,7.654 30.322,8.658 30.394,8.729 30.537,8.729 30.609,8.658 30.609,7.67 30.834,7.445 31.194,7.445 31.419,7.67 31.419,8.37 31.474,8.425 31.669,8.619 31.928,8.879 32.061,8.879 32.155,8.785 32.287,8.785 32.375,8.873 32.375,9.006 32.282,9.1 32.282,9.232 32.469,9.419 32.77,9.721 v1(32.98,9.721)
NetC7_2: C7.2 R16.2 U2.1 | length 5.1
  01 TOP w0.254: v1(8.224,8.619) 8.4,8.444 U2.1@8.4,7
  04 BOT w0.254: v1(8.224,8.619) 8.598,8.246 R16.2@8.598,7.801 9.174,7.801 9.487,7.488 9.487,7.078 9.784,6.782 C7.2@10.4,6.782
NetC8_1: C8.1 L1.1 R21.1 U3.9 | length 1.5
  04 BOT w0.198: R21.1@14.778,13.953 14.778,13.293 v1(14.981,13.09) C8.1@14.981,12.531
NetC8_2: C8.2 U3.10 | length 1.6
  01 TOP w0.198: v1(13.609,11.794) 13.754,11.65 U3.10@14.225,11.65
  04 BOT w0.198: v1(13.609,11.794) 13.609,12.175 C8.2@13.965,12.531
NetC16_1: C16.1 R21.2 R22.1 R24.1 U3.12 | length 6.4
  01 TOP w0.198: v1(13.447,10.749) 13.548,10.85 U3.12@14.225,10.85
  04 BOT w0.198: v1(13.447,10.749) 14.162,11.464 R24.1@15.057,11.464 R22.1@16.124,11.464 C16.1@16.124,12.531 16.124,13.039 16.352,13.268 R21.2@16.352,13.953
NetC19_2: C19.2 R26.2 U3.11 | length 7.5
  01 TOP w0.198: v1(13.175,11.25) U3.11@14.225,11.25
  04 BOT w0.198: v1(13.175,11.25) 12.924,11 12.924,9.62 13.518,9.026 14.165,9.026 14.495,9.356 C19.2@16.124,9.356 R26.2@16.124,10.448
NetC28_1: C28.1 Q3.1 Q4.3 R33.2 | length 8.8
  04 BOT w0.254: R33.2@61.441,16.392 C28.1@62.441,16.392 62.441,15.892 62.683,15.65 Q3.1@63.841,15.65 63.841,16.078 65.841,18.078 Q4.3@65.841,20.634
NetC31_2: C31.2 R38.2 U5.9 | length 3
  01 TOP w0.229: R38.2@10.72,24.2 R38.2@10.723,24.202 ; U5.9@10.723,26.082 R38.2@10.723,24.202 ; C31.2@11.808,24.203 R38.2@10.723,24.203
NetC38_2: C38.2 C39.2 FB1.2 U7.1 U7.12 | length 9.3
  01 TOP w0.156: U7.1@98.576,9.6 v1(99.446,9.6) ; U7.12@98.576,14 v1(99.446,14)
  03 Signal w0.381: v1(99.446,14) 100.071,13.375 100.071,12.48 99.766,12.175 99.461,12.175 98.805,11.519 98.805,10.241 v1(99.446,9.6) 99.614,9.432 v1(99.614,9.051)
  04 BOT w0.381: C38.2@98.808,9.8 99.246,9.8 v1(99.446,9.6) ; C39.2@98.808,14 v1(99.446,14)
NetC60_2: C60.2 FB3.2 P14.23 | length 9.6
  04 BOT w0.229: P14.23@53.491,5.78 53.491,7.385 53.639,7.533
  04 BOT w0.381: FB3.2@53.522,14.413 53.509,14.401 C60.2@53.509,13.113 53.962,13.113 54.295,12.78 54.295,8.189 53.639,7.533
NetC71_2: C71.2 Q9.1 R84.2 | length 2.4
  01 TOP w0.156: Q9.1@20.401,66.776 20.958,66.776 21.1,66.918 C71.2@21.501,66.918 21.875,66.918 21.954,66.839 R84.2@22.664,66.839
NetC104_1: C104.1 U17.30 | length 3.2
  01 TOP w0.229: U17.30@101.922,64.532 103.708,64.532 C104.1@104.694,63.547
NetC105_2: C105.2 U17.2 | length 2.3
  01 TOP w0.156: C105.2@100.744,68.485 100.747,68.481 U17.2@100.747,66.207
NetC106_2: C106.2 U17.1 | length 2.6
  01 TOP w0.156: U17.1@101.247,66.207 101.247,67.282 101.844,67.879 C106.2@101.844,68.585
NetC107_1: C107.1 U17.29 | length 4
  01 TOP w0.229: U17.29@101.922,64.032 v1(103.503,64.032) ; v1(103.503,65.112) 103.944,65.554 C107.1@104.694,65.554
  04 BOT w0.229: v1(103.503,64.032) v1(103.503,65.112)
NetC108_2: C108.2 U17.5 | length 3.2
  01 TOP w0.156: C108.2@97.479,68.485 97.479,68.056 97.718,67.817 98.092,67.817 99.247,66.663 U17.5@99.247,66.207
NetC109_2: C109.2 U17.4 | length 2.3
  01 TOP w0.156: C109.2@99.613,68.488 99.613,67.996 99.747,67.862 U17.4@99.747,66.207
NetC111_2: C111.2 P19.2 | length 20.2
  01 TOP w0.254: C111.2@106.726,59.534 107.173,59.086 v1(107.173,58.306)
  04 BOT w0.254: v1(107.173,58.306) 107.173,60.547 110.025,63.398 112.776,63.398 113.817,64.439 113.817,68.605 116.043,70.831 P19.2@116.043,71.793
NetC112_2: C112.2 C113.2 U17.27 | length 0.9
  01 TOP w0.254: U17.27@101.922,63.032 102.728,63.032 v1(102.829,63.133)
NetC119_2: C119.2 R131.1 | length 1.1
  04 BOT w0.156: C119.2@109.161,58.46 109.172,58.471 R131.1@110.232,58.471
NetC120_2: C120.2 R133.1 | length 1.1
  04 BOT w0.156: C120.2@109.448,65.23 109.46,65.242 R133.1@110.54,65.242
NetC122_2: C122.2 P19.1 | length 15.7
  01 TOP w0.254: C122.2@106.726,61.54 106.726,61.609 107.382,62.265 v1(107.549,62.265)
  04 BOT w0.254: v1(107.549,62.265) 106.909,62.906 106.909,67.056 108.611,68.758 111.684,68.758 114.043,71.117 P19.1@114.043,71.793
NetC126_2: C126.2 R137.2 U20.1 | length 0.7
  01 TOP w0.156: U20.1@96.763,29.594 v1(97.435,29.594)
NetC128_2: C128.2 R141.2 U20.17 | length 3.7
  01 TOP w0.156: v1(91.068,30.094) U20.17@92.813,30.094
  04 BOT w0.156: v1(91.068,30.094) 91.45,30.476 R141.2@91.848,30.476 C128.2@91.848,31.476
NetC135_2: C135.2 P24.50 R149.2 | length 3.2
  04 BOT w0.156: C135.2@88.1,52.58 R149.2@88.1,53.58 P24.50@90.3,53.58
NetD2_1: D2.1 R28.2 | length 1.8
  01 TOP w0.254: D2.1@28.671,10.562 29.433,11.324 R28.2@29.433,11.998
NetD3_2: D3.2 P7.2 | length 21.1
  01 TOP w0.254: P7.2@31.593,47.506 32.546,47.506 33.091,48.051 v1(33.091,50.725)
  04 BOT w0.254: D3.2@26.229,64.602 26.229,64.206 28.109,62.326 28.109,55.707 v1(33.091,50.725)
NetD5_2: D5.2 R82.1 R85.1 | length 3.1
  01 TOP w0.156: D5.2@16.751,66.626 16.809,66.568 R85.1@16.809,64.926 R82.1@16.809,63.526
NetDT9_1: DT9.1 P11.1 R39.2 | length 5.5
  04 BOT w0.156: P11.1@67.041,14.701 67.041,16.712 67.479,17.15 DT9.1@67.891,17.15 67.891,17.558 67.081,18.368 R39.2@67.081,19.279
NetDT9_4: DT9.4 P11.3 R41.2 | length 5.3
  04 BOT w0.156: R41.2@68.885,19.279 68.885,18.647 69.391,18.141 DT9.4@69.391,17.15 69.624,17.15 69.803,16.971 69.803,16.173 69.241,15.61 P11.3@69.241,14.701
NetDT9_7: DT9.7 P11.2 R40.2 | length 5.1
  01 TOP w0.156: v1(67.729,16.45) 67.729,18.25 v1(67.97,18.491)
  04 BOT w0.156: v1(67.729,16.45) DT9.7@68.141,16.45 P11.2@68.141,14.701 ; v1(67.97,18.491) R40.2@67.97,19.279
NetDT10_1: DT10.1 P11.5 R42.2 | length 7.1
  04 BOT w0.156: P11.5@71.441,14.701 71.441,15.677 72.914,17.15 DT10.1@73.491,17.15 73.491,17.537 73.308,17.72 72.306,17.72 71.755,18.271 R42.2@71.755,19.279
NetDT10_4: DT10.4 P11.9 R46.2 | length 5.3
  04 BOT w0.156: R46.2@74.498,19.279 74.498,18.184 74.991,17.691 DT10.4@74.991,17.15 75.255,17.15 75.701,16.703 75.701,15.726 75.841,15.586 P11.9@75.841,14.701
NetDT10_5: DT10.5 P11.8 R44.2 | length 6.1
  01 TOP w0.156: v1(73.584,18.491) 74.191,18.491 75.197,17.486 v1(75.197,16.45)
  04 BOT w0.156: v1(73.584,18.491) R44.2@73.584,19.279 ; P11.8@74.741,14.701 DT10.5@74.741,16.45 v1(75.197,16.45)
NetDT10_7: DT10.7 P11.7 R43.2 | length 5.5
  01 TOP w0.156: v1(72.469,18.382) 72.469,17.237 v1(73.256,16.45)
  04 BOT w0.156: v1(72.469,18.382) 72.669,18.582 R43.2@72.669,19.279 ; v1(73.256,16.45) DT10.7@73.741,16.45 73.741,15.919 73.641,15.819 P11.7@73.641,14.701
NetDT24_2: DT24.2 P21.7 R130.2 | length 3.4
  01 TOP w0.156: v1(117.302,57.556) P21.7@117.302,59.006
  04 BOT w0.156: R130.2@116.288,58.421 117.263,58.421 DT24.2@117.288,58.446 117.288,57.569 v1(117.302,57.556)
NetF2_1: F2.1 P10.A4/B9 P10.B4/A9 | length 12.2
  01 TOP w0.508: v2(2.218,31.44) 2.218,30.572 4.661,28.129 5.555,28.129 5.864,27.82 P10.B4/A9@6.68,27.82 ; v2(4.093,32.425) 5.56,32.425 5.835,32.699 6.659,32.699 P10.A4/B9@6.68,32.72
  04 BOT w0.508: v2(2.218,31.44) 2.218,32.541 F2.1@2.227,32.55 2.353,32.425 v2(4.093,32.425)
NetFB4_2: FB4.2 P14.25 | length 10.2
  04 BOT w0.229: P14.25@54.491,5.78 54.491,6.833
  04 BOT w0.381: 54.491,6.833 58.297,10.639 FB4.2@58.297,14.413
NetFB5_2: FB5.2 P16.1 | length 3.2
  01 TOP w0.508: P16.1@87.797,5.189 87.797,4.688 88.183,4.302 ; v2(89.131,3.617) 88.868,3.617 88.183,4.302 ; v2(89.131,4.302) 88.183,4.302
NetL2_1: L2.1 U4.1 U4.9 | length 5.6
  01 TOP w0.381: U4.9@19.941,9.267 20.235,9.267 22.135,9.267 23.096,9.267 23.263,9.1 L2.1@25.435,9.1
NetL3_1: L3.1 U7.32 | length 0.9
  01 TOP w0.203: 92.323,11.193 92.323,11.2 U7.32@92.824,11.2
  01 TOP w0.305: v2(92.058,10.935) 92.317,11.193 92.323,11.193
NetP9_53: P9.53 R155.2 | length 2.5
  01 TOP w0.156: R155.2@21.153,23.692 v1(22.084,23.692)
  04 BOT w0.178: P9.53@20.629,23.411 21.804,23.411 v1(22.084,23.692)
NetP9_54: P9.54 R8.2 | length 8
  01 TOP w0.156: R8.2@21.153,20.72 v1(21.925,20.72)
  04 BOT w0.156: v1(21.925,20.72) 22.213,20.72 24.654,23.161 P9.54@28.179,23.161
NetP9_55: P9.55 R95.2 | length 2.7
  01 TOP w0.156: R95.2@21.153,22.701 21.965,22.701 v1(22.175,22.911)
  04 BOT w0.178: P9.55@20.629,22.911 v1(22.175,22.911)
NetP9_56: P9.56 R20.2 | length 8.2
  01 TOP w0.156: R20.2@21.153,19.73 v1(21.925,19.73)
  04 BOT w0.156: v1(21.925,19.73) 24.857,22.661 P9.56@28.179,22.661
NetP10_A5: P10.A5 R34.2 | length 2.1
  01 TOP w0.254: P10.A5@6.68,31.52 v1(7.878,31.52)
  04 BOT w0.254: R34.2@7.104,31.787 7.612,31.787 v1(7.878,31.52)
NetP10_B5: P10.B5 R35.2 | length 2.3
  01 TOP w0.254: P10.B5@6.68,28.52 7.501,28.52 7.79,28.231 v1(7.79,27.977)
  04 BOT w0.254: v1(7.79,27.977) 7.79,28.802 R35.2@7.8,28.812
NetP13_12: P13.12 R76.2 | length 8.5
  04 BOT w0.254: R76.2@113.792,9.271 114.3,9.271 115.382,8.189 115.382,6.934 116.385,5.93 116.385,4.329 P13.12@117.9,2.815
NetP13_14: P13.14 R77.2 | length 8.1
  04 BOT w0.254: R77.2@113.792,10.287 114.45,10.287 117.9,13.737 P13.14@117.9,16.265
NetP24_52: P24.52 R150.2 | length 2.4
  04 BOT w0.156: R150.2@88.1,54.58 88.708,54.58 89.208,54.08 P24.52@90.3,54.08
NetP24_54: P24.54 R151.2 | length 2.7
  04 BOT w0.156: R151.2@88.1,55.58 88.633,55.58 89.098,55.115 89.098,54.911 89.429,54.58 P24.54@90.3,54.58
NetQ1_1: Q1.1 R25.2 | length 2.6
  01 TOP w0.156: Q1.1@9.3,16.85 v1(9.3,17.577)
  04 BOT w0.156: R25.2@8,16.908 8,17.336 8.241,17.577 v1(9.3,17.577)
NetQ1_3: Q1.3 R23.1 U3.13 | length 9.6
  01 TOP w0.156: Q1.3@11.3,15.9 11.563,15.9 12.03,16.366 R23.1@12.593,16.366
  01 TOP w0.198: R23.1@12.593,16.366 13.011,16.366 13.26,16.117 13.26,12.124 12.697,11.561 12.697,10.778 13.203,10.272 13.628,10.272 13.806,10.45 U3.13@14.225,10.45
NetQ2_1: Q2.1 R27.2 | length 1.5
  04 BOT w0.156: Q2.1@11.3,16.85 12.11,16.85 R27.2@12.593,16.366
NetQ2_3: Q2.3 R25.1 | length 1.3
  04 BOT w0.156: R25.1@8,15.892 8.008,15.9 Q2.3@9.3,15.9